# Altium PCB PCB2.PcbDoc
Units mil, origin at the board's own origin, x right, y up, seen from the top; angles counter-clockwise.
Board outline 2520 x 1820 mil, 2 copper layers (Top Layer, Bottom Layer); 51 components, 35 nets, 196 pads, 76 vias.
Unrouted connection lines stored in the file: 1.
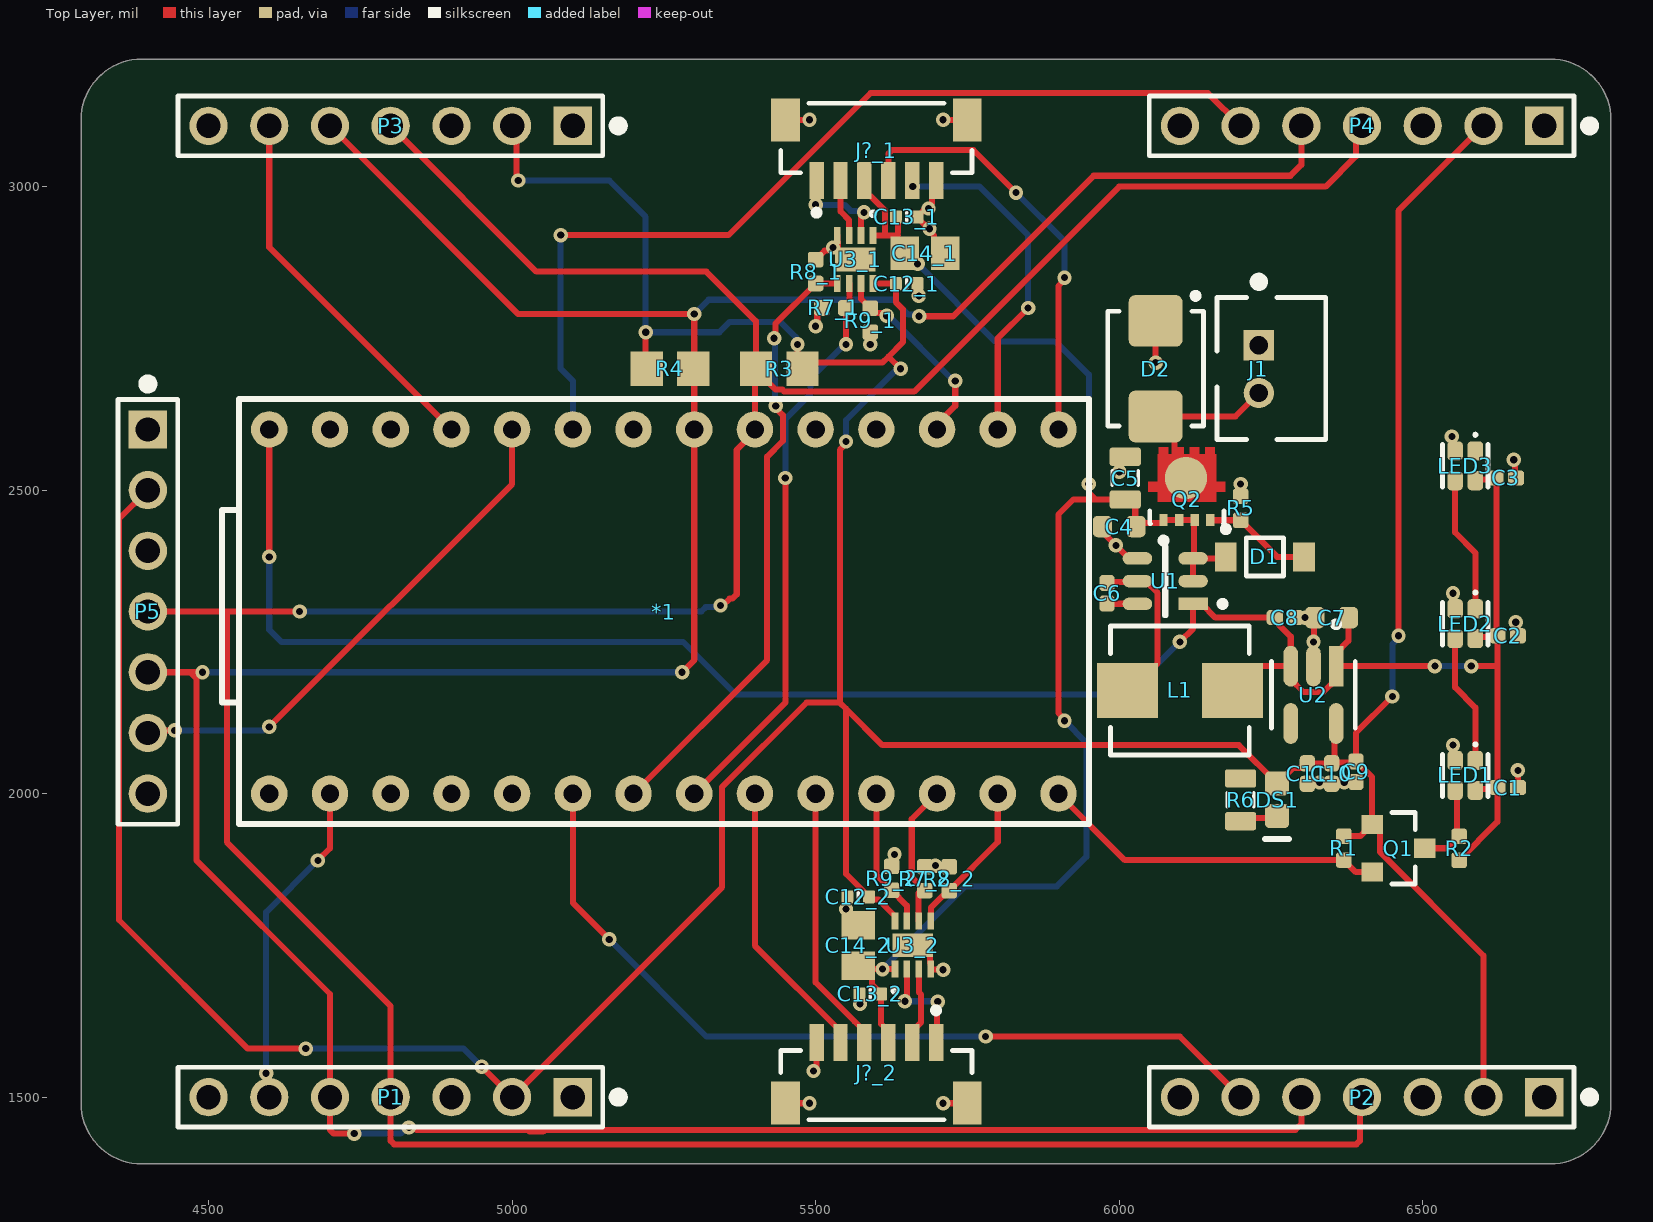
[diagram p0: Top Layer view]
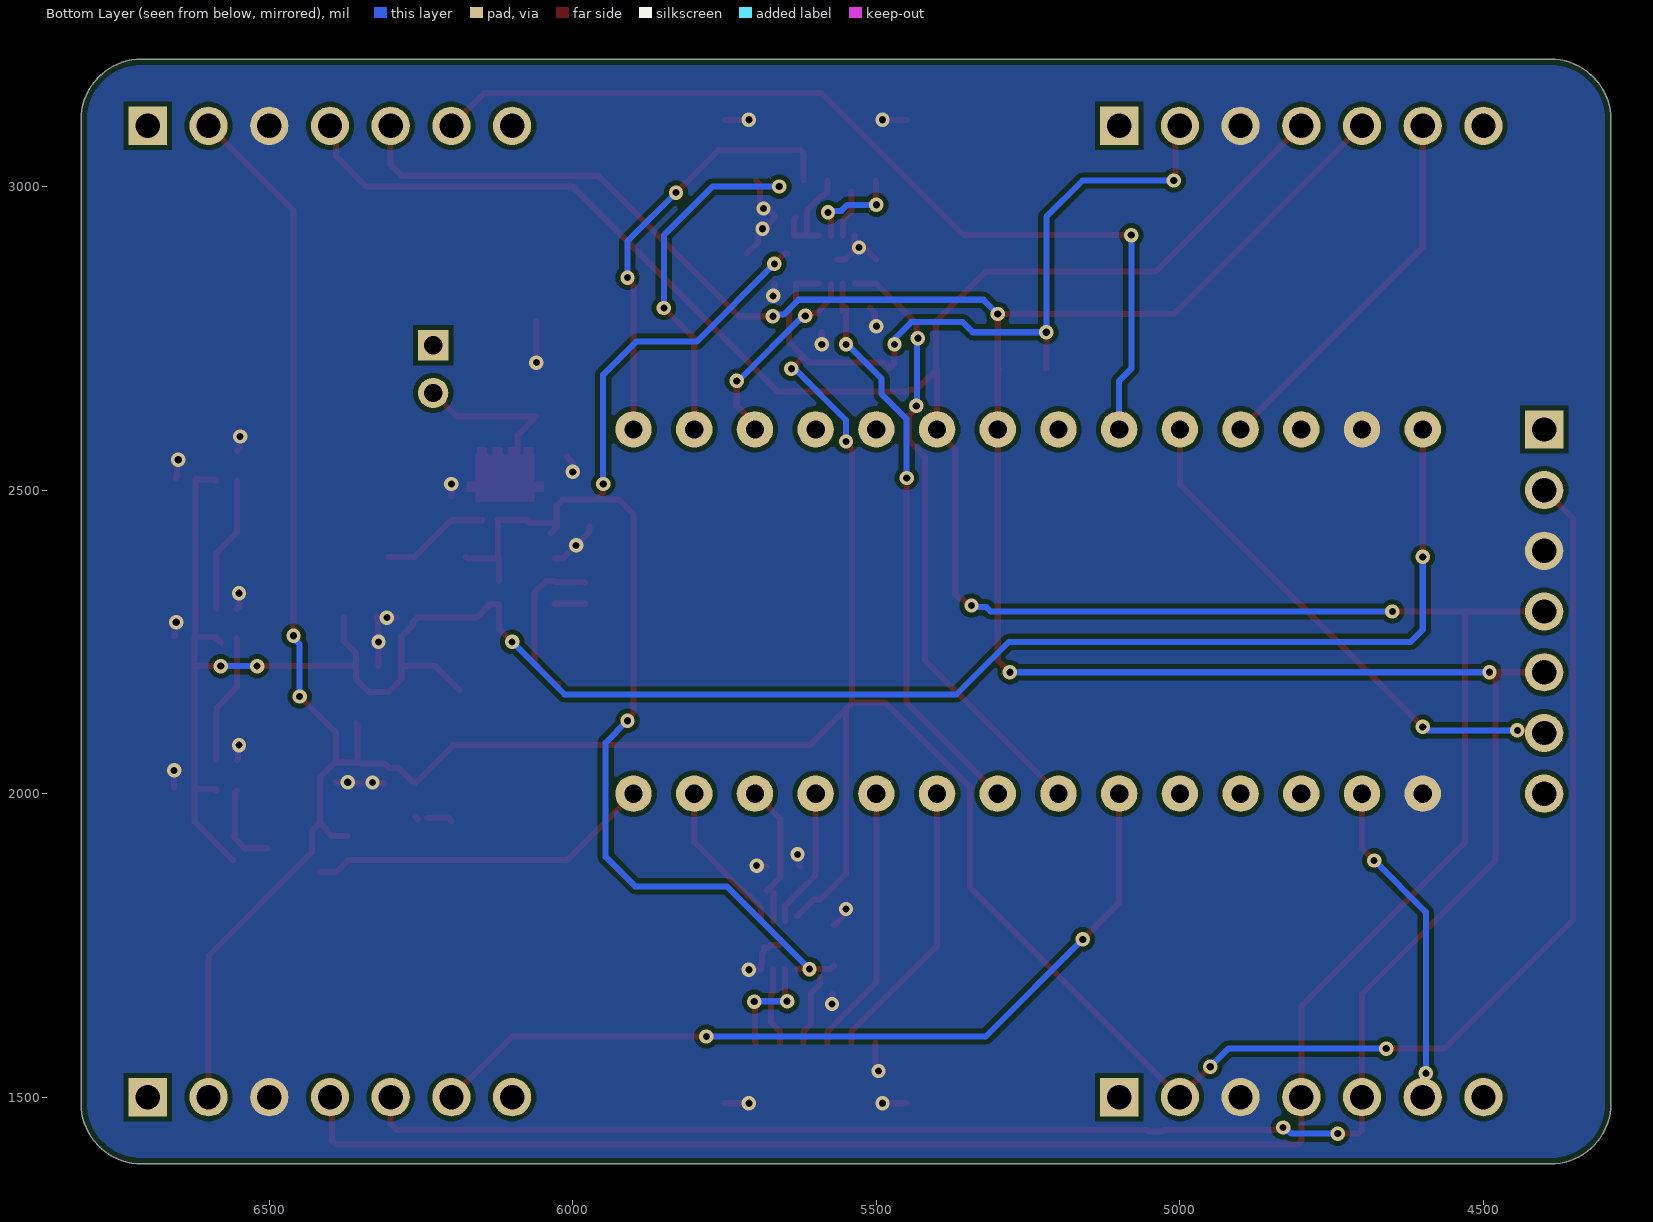
[diagram p1: Bottom Layer view, seen from below]
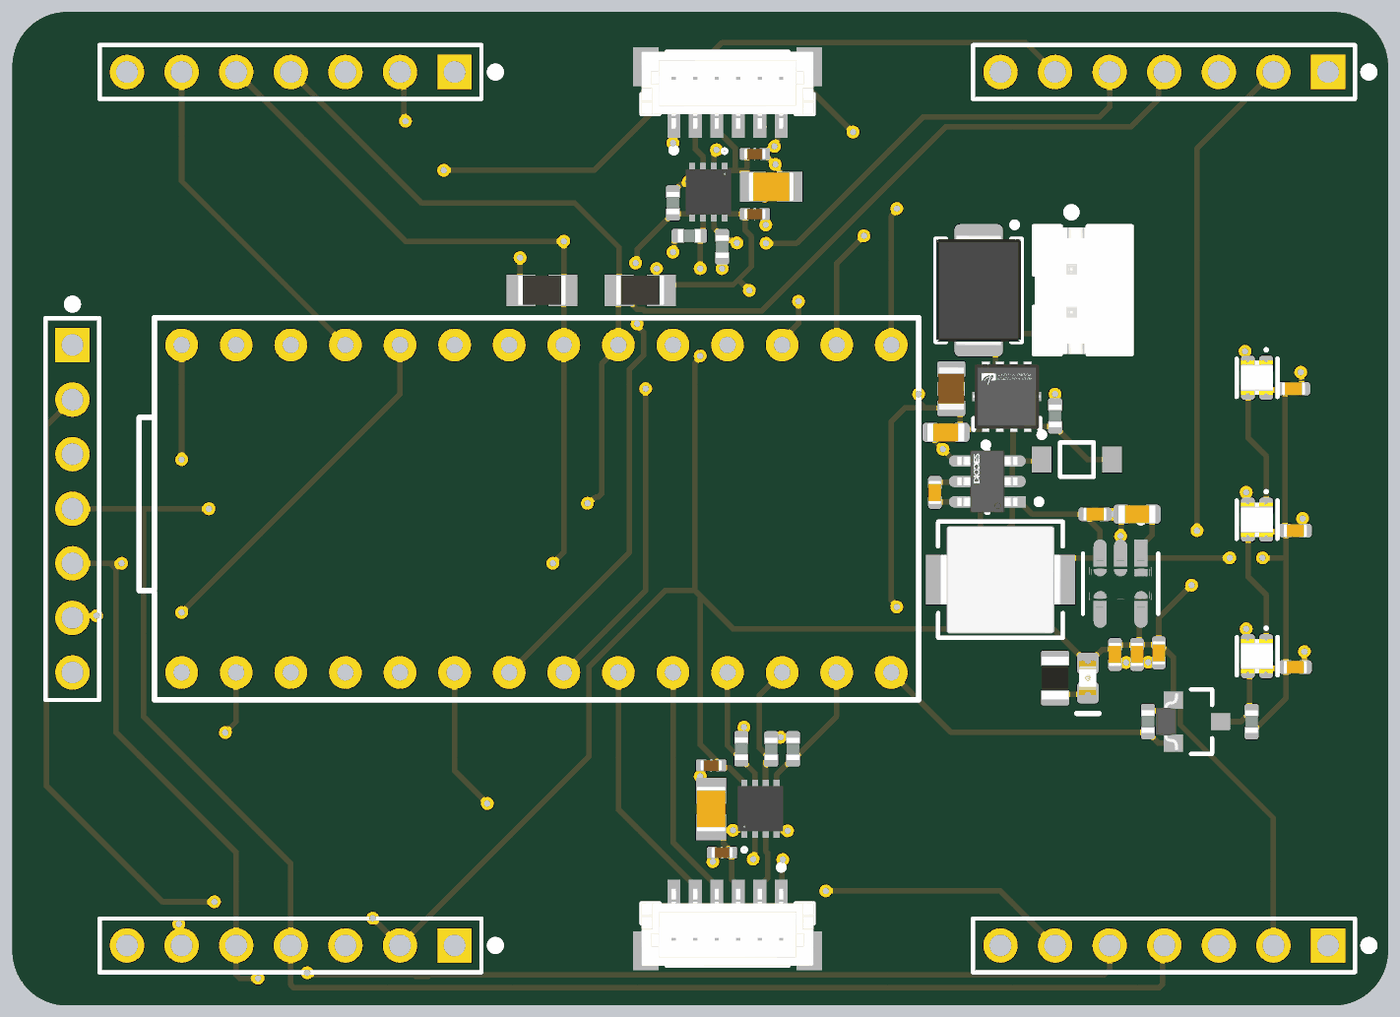
[diagram p2: 3D render of the assembled board from above, using the file's embedded part models]

## Layer stack, top to bottom
Top Solder: solder mask 0.4, Solder Resist, Dk 3.5
Top Layer: signal copper 1.4
Dielectric 1: dielectric 12.6, FR-4, Dk 4.8
Bottom Layer: signal copper 1.4
Bottom Solder: solder mask 0.4, Solder Resist, Dk 3.5

## Board outline
4290,1490 4290,3110 cw(c4390,3110) 4390,3210 6710,3210 cw(c6710,3110) 6810,3110 6810,1490 cw(c6710,1490) 6710,1390 4390,1390 cw(c4390,1490)

## Design rules (kind name [scope] priority, off if disabled: settings)
BoardOutlineClearance [All] p1: gap=10 ignorepadtopadclearanceinfootprint=FALSE except(0: Arc-SplitContinuation Track-SplitContinuation SMDPad-SplitContinuation THPad-SplitContinuation Via-SplitContinuation Fill-SplitContinuation Poly-SplitContinuation Region-SplitContinuation Text-SplitContinuation)
Clearance [All] p1: gap=7.87 ignorepadtopadclearanceinfootprint=TRUE except(3.94: Arc-SMDPad Track-SMDPad; 5.91: Arc-Text Track-Text SMDPad-SMDPad SMDPad-Text THPad-Text Via-Text Fill-Text Poly-Text Region-Text; 9.84: Arc-Via Track-Via; 10: SMDPad-THPad SMDPad-Via THPad-THPad THPad-Via Via-Via Text-Text; 11.02: Arc-THPad Track-THPad)
DiffPairsRouting [All] p1: maxlimit=7.87 minlimit=7.87 mostfreqgap=7.87 toplayer_minwidth=15 toplayer_maxwidth=21.19 toplayer_prefwidth=21.19 bottomlayer_minwidth=15 bottomlayer_maxwidth=21.19 bottomlayer_prefwidth=21.19 impedanceprofiledriven=TRUE impedanceprofileid={89AA14D4-A2A4-49F1-A537-A2CA9A9DB853} maxuncoupledlength=500
Height [All] p1: minheight=0 maxheight=99999 prefheight=500
HoleSize [All] p1: absolutevalues=TRUE maxlimit=196.85 minlimit=1 maxpercent=80.000 minpercent=20.000
MinimumSolderMaskSliver [All] p1: minsoldermaskwidth=3.94
PlaneConnect [All] p1: planeconnectstyle=Direct reliefexpansion=20 reliefentries=4 reliefconductorwidth=10 reliefairgap=10
PolygonConnect [All] p1: connectstyle=Direct reliefconductorwidth=10 reliefentries=4 polygonreliefangle="90 Angle" airgapwidth=10
RoutingVias [All] p1: holewidth=11.81 width=23.62 viastyle="Through Hole" minholewidth=11.81 minwidth=19.68 maxholewidth=11.81 maxwidth=31.5
SilkToSolderMaskClearance [IsPad] p1: minsilkscreentomaskgap=2.01 clearancetoexposedcopper=TRUE
SolderMaskExpansion [All] p1: expansion=1.5 istentingtop=FALSE
SupplyNets "Schematic Supply Nets_12" [InNet('P5V0')] p1: voltage=0.000
SupplyNets "Schematic Supply Nets_11" [InNet('VINUP')] p2: voltage=0.000
SupplyNets "Schematic Supply Nets_1" [InNet('VIN')] p3: voltage=0.000
SupplyNets "Schematic Supply Nets_6" [InNet('GND')] p4: voltage=0.000
SupplyNets "Schematic Supply Nets_2" [InNet('P3V3')] p5: voltage=0.000
UnRoutedNet [All] p1: checkbadconnections=TRUE
Width [All] p1: maxlimit=590.55 minlimit=6.3 preferedwidth=10 minimp=50.000000 maximp=50.000000 favimp=50.000000
23 further rules are at their usual default settings.

## Classes and differential pairs
channel class MotorControl: U_MotorControl1 U_MotorControl2
component class U_Power: C4 C5 C6 C7 C8 C9 C10 C11 D1 D2 DS1 J1 L1 Q2 R5 R6 U1 U2
component class U_MotorControl2: C12_2 C13_2 C14_2 J?_2 R7_2 R8_2 R9_2 U3_2
component class U_MotorControl1: C12_1 C13_1 C14_1 J?_1 R7_1 R8_1 R9_1 U3_1
component class U_Microcontroller: *1
component class U_GPIO: C1 C2 C3 LED1 LED2 LED3 P1 P2 P3 P4 P5 Q1 R1 R2 R3 R4

## Components (designator, comment, footprint, x,y, rotation, side; value= is the part's Value field where it differs from the comment)
*1 "TEENSY40" TEENSY40-Footprint-1 4550,1950 r0 top
C1 "100n 16V X7R 0402" C0402 6640,2010 r0 top value=100nF
C2 "100n 16V X7R 0402" C0402 6640,2260 r0 top value=100nF
C3 "100n 16V X7R 0402" C0402 6636.93,2520 r0 top value=100nF
C4 "10uF 35V 0603" C0603 6000,2440 r180 top value=10u
C5 "Capacitor 47µF +/-40% 6.3V 0805" CAPC0805(2012)145_L 6010,2520 r90 top value=47µF
C6 "100n 16V X7R 0402" C0402 5980,2330 r270 top value=100nF
C7 "22uF 10V 0603 X5R" C0603 6350,2290 r180 top value=22uF
C8 "1uF 16V X5R 0402" C0402 6273.07,2290 r0 top value=1u
C9 "1uF 16V X5R 0402" C0402 6390,2036.14 r270 top value=1u
C10 "1uF 16V X5R 0402" C0402 6350,2033.07 r270 top value=1u
C11 "1uF 16V X5R 0402" C0402 6310,2033.07 r270 top value=1u
C12_1 "Capacitor 100nF +/-20% 25V 0402" CAPC0402(1005)60_L 5650,2840 r180 top value=100nF (schematic designator C12)
C12_2 "Capacitor 100nF +/-20% 25V 0402" CAPC0402(1005)60_L 5570,1830 r0 top value=100nF (schematic designator C12)
C13_1 "Capacitor 100nF +/-20% 25V 0402" CAPC0402(1005)60_L 5650,2950 r180 top value=100nF (schematic designator C13)
C13_2 "Capacitor 100nF +/-20% 25V 0402" CAPC0402(1005)60_L 5590,1670 r0 top value=100nF (schematic designator C13)
C14_1 "Capacitor 10 uF +/- 10% 16 V 0805" CAPC2013X135X45NL10T25 5680,2890 r180 top value=10µF (schematic designator C14)
C14_2 "Capacitor 10 uF +/- 10% 16 V 0805" CAPC2013X135X45NL10T25 5570,1750 r270 top value=10µF (schematic designator C14)
D1 "MMSZ10T1G" ONSC-SOD-123-2-425-04_V 6240,2390 r0 top
D2 "SMBJ17CA" DO214-AA 6060,2700 r270 top
DS1 "KT-0603W" LED0603 6260,1990 r270 top
J1 "CONN-00048" JST_PHR_2_0 6230,2738.74 r270 top
J?_1 "BM06B-SRSS-TBT(LF)(SN)" FP-BM06B-SRSS-TBT_LF_SN-MFG 5600,3080 r0 top (schematic designator J?)
J?_2 "BM06B-SRSS-TBT(LF)(SN)" FP-BM06B-SRSS-TBT_LF_SN-MFG 5600,1520 r180 top (schematic designator J?)
L1 "4.7uH 4.5A FXL0530-4R7-M" INDP5452X30N 6100,2170 r0 top value=4u7
LED1 "XL-1615RGBC-WS2812B" XL-1615RGBC-WS2812B-Footprint-1 6570,2030 r270 top
LED2 "XL-1615RGBC-WS2812B" XL-1615RGBC-WS2812B-Footprint-1 6570,2280 r270 top
LED3 "XL-1615RGBC-WS2812B" XL-1615RGBC-WS2812B-Footprint-1 6570,2540 r270 top
P1 "CONN-00105" HDDR_7x1_0 4800,1500 r180 top
P2 "CONN-00105" HDDR_7x1_0 6400,1500 r180 top
P3 "CONN-00105" HDDR_7x1_0 4800,3100 r180 top
P4 "CONN-00105" HDDR_7x1_0 6400,3100 r180 top
P5 "CONN-00105" HDDR_7x1_0 4400,2300 r270 top
Q1 "2N7002H6327XTSA2" FP-PG-SOT23-3-MFG 6460,1910 r0 top
Q2 "AONR21321" FP-DFN3x3A_8L_EP1_P-MFG 6111.48,2505.53 r0 top
R1 "1k 1% 0402" R0402 6370,1910.32 r270 top value=1k
R2 "1k 1% 0402" R0402 6560,1910 r90 top value=1k
R3 "Resistor 4k7 +/-1% 0805 125 mW" RESC2013X70X40ML20T20 5440,2700 r0 top value=4.7k
R4 "Resistor 4k7 +/-1% 0805 125 mW" RESC2013X70X40ML20T20 5260,2700 r180 top value=4.7k
R5 "10k 1% 0402" R0402 6200,2470 r270 top value=10k
R6 "Resistor 1K +/-5% 0805 125 mW" RESC0805(2012)_L 6200,1990 r90 top value=1k
R7_1 "10k 1% 0402" R0402 5530,2800 r0 top value=10k (schematic designator R7)
R7_2 "10k 1% 0402" R0402 5680,1860 r270 top value=10k (schematic designator R7)
R8_1 "10k 1% 0402" R0402 5500,2860 r270 top value=10k (schematic designator R8)
R8_2 "10k 1% 0402" R0402 5720,1860 r270 top value=10k (schematic designator R8)
R9_1 "10k 1% 0402" R0402 5590,2780 r90 top value=10k (schematic designator R9)
R9_2 "10k 1% 0402" R0402 5625.16,1860.5 r270 top value=10k (schematic designator R9)
U1 "AP63205WU-7" FP-TSOT26-IPC_B 6075.89,2350 r180 top
U2 "AP2112K-3.3TRG1" FP-SOT25-IPC_A 6320,2162.73 r270 top
U3_1 "DRV8212PDSGR" WSON8_DSG_TEX 5565,2880 r270 top (schematic designator U3)
U3_2 "DRV8212PDSGR" WSON8_DSG_TEX 5660.16,1750.5 r90 top (schematic designator U3)

## Footprints (in the part's own frame and the unit in brackets; to place one, negate y for a bottom-side part, rotate by r counter-clockwise, add the part's x,y. Pads: shape width x height; smd on the part's side, far side on the other; paste and mask are expansions set on the pad)
C0402 [mm] "Chip Capacitor, 2-Leads, Body 1.00x0.50mm, IPC Medium Density"
  rrect50% 0.68x0.64 smd: 1(-0.43,0) 2(0.43,0)
  body extent -0.55,-0.3 0.55,0.3, height 0.6
C0603 [mm] "Chip Capacitor, 2-Leads, Body 1.60x0.75mm, IPC Medium Density"
  rrect50% 0.8x0.9 smd: 1(-0.7,0) 2(0.7,0)
  body extent -0.87,-0.43 0.87,0.43, height 0.8
CAPC0402(1005)60_L [mm] "Chip Capacitor, Body 1.0x0.5mm, Height 0.6mm, IPC High Density"
  rrect25% 0.5x0.55 smd: 1(-0.45,0) 2(0.45,0)
  silkscreen extent 0,-0.2 0,0.2, body extent -0.5,-0.25 0.5,0.25, height 0.6
CAPC0805(2012)145_L [mm] "Chip Capacitor, Body 2.0x1.2mm, Height 1.45mm, IPC High Density"
  rrect25% 0.76x1.3 smd: 1(-0.9,0) 2(0.89,0)
  silkscreen extent -0.3,-0.55 0.3,0.55, body extent -1,-0.6 1,0.6, height 1.45
CAPC2013X135X45NL10T25 [mm] "Chip Capacitor, 2-Leads, Body 2.10x1.35mm, IPC Medium Density"
  rect 1.2x1.4 smd: 1(-0.85,0) 2(0.85,0)
  body extent -1.05,-0.67 1.05,0.67, height 1.35
DO214-AA [mm] "DO214-AA Diode Package"
  rrect25% 2.16x2.25 smd: 1(-2,0) 2(2,0)
  silkscreen extent -3.17,-2 2.4,2, body extent -2.6,-1.97 2.6,1.97, height 2.61
FP-BM06B-SRSS-TBT_LF_SN-MFG [mm]
  rect 0.6x1.55 smd paste+0 mask+0: 1(-2.5,-1.775) 2(-1.5,-1.775) 3(-0.5,-1.775) 4(0.5,-1.775) 5(1.5,-1.775) 6(2.5,-1.775)
  rect 1.2x1.8 smd paste+0 mask+0: 7(-3.8,0.75) 8(3.8,0.75)
  silkscreen extent -4,-3.25 4,1.45, body extent -4.5,-2.65 4.5,1.75, height 0.25
FP-DFN3x3A_8L_EP1_P-MFG [mm]
  rect 0.35x0.5 smd paste+0 mask+0: 1(-0.975,-1.4) 2(-0.325,-1.4) 3(0.325,-1.4) 4(0.975,-1.4)
  round 1.769 smd paste+0 mask+0: 5-6-7-8(-0.038,0.367)
  Top Layer region: -1.225,-0.63 -1.225,-0.215 -1.605,-0.215 -1.605,0.215 -1.225,0.215 -1.225,1.35 -1.175,1.35 -1.175,1.65 -0.775,1.65 -0.775,1.35 -0.525,1.35 -0.525,1.65 -0.125,1.65 -0.125,1.35 0.125,1.35 0.125,1.65 0.525,1.65 0.525,1.35 0.775,1.35 0.775,1.65 1.175,1.65 1.175,1.35 1.225,1.35 1.225,0.215 1.605,0.215 1.605,-0.215 1.225,-0.215 1.225,-0.63
  silkscreen extent -1.55,-2.37 1.55,-1.01, body extent -1.71,-1.75 1.71,1.75, height 0.25
FP-PG-SOT23-3-MFG [mm]
  rect 0.9x0.8 smd paste+0 mask+0: 1(-1.1,1) 2(-1.1,-1) 3(1.1,0)
  silkscreen extent -0.28,-1.5 0.7,1.5, body extent -1.65,-1.6 1.65,1.6, height 0.25
FP-SOT25-IPC_A [mm]
  rect 1.707x0.616 smd paste+0 mask+0: 1(-1.201,0.95)
  rrect100% 1.707x0.616 smd paste+0 mask+0: 2(-1.201,0) 3(-1.201,-0.95) 4(1.201,-0.95) 5(1.201,0.95)
  silkscreen extent -3.08,-1.75 1.4,1.75, body extent -2.55,-2 2.55,2, height 0.25
FP-TSOT26-IPC_B [mm]
  rect 1.24x0.526 smd paste+0 mask+0: 1(-1.165,0.95)
  rrect100% 1.24x0.526 smd paste+0 mask+0: 2(-1.165,0) 3(-1.165,-0.95) 4(1.166,-0.95) 5(1.166,0) 6(1.166,0.95)
  silkscreen extent -2.53,-1.45 0.05,1.45, body extent -2.04,-1.7 2.04,1.7, height 0.25
HDDR_7x1_0 [mm]
  rect 1.6x1.6 hole 1.016: 1(-7.62,0)
  round 1.6 hole 1.016: 2(-5.08,0) 3(-2.54,0) 4(0,0) 5(2.54,0) 6(5.08,0) 7(7.62,0)
  silkscreen extent -9.72,-1.25 8.9,1.25, body extent -8.89,-1.27 8.89,1.27, height 8.54
INDP5452X30N [mm] "Precision Wire Wound Inductor, 2-Leads, Body 5.40x5.20mm, IPC Medium Density"
  rect 2.55x2.3 smd: 1(-2.2,0) 2(2.2,0)
  silkscreen extent -2.9,-2.7 2.9,2.7, body extent -2.8,-2.5 2.8,2.5, height 3
JST_PHR_2_0 [mil]
  rect 50x50 hole 30: 1(0,0)
  round 50 hole 30: 2(78.74,0)
  silkscreen extent -112,-69 156,110, body extent -77,-69 156,110, height 236
LED0603 [mm] "0603 LED"
  rrect35% 1x1 smd: 1(0.685,0) 2(-0.685,0)
  silkscreen extent 1.65,-0.51 1.65,0.51, body extent -0.8,-0.4 0.8,0.4, height 0.55
ONSC-SOD-123-2-425-04_V [mm] "SOD, 2-Leads, Body 2.69x1.6mm"
  rect 0.91x1.22 smd: 1(-1.635,0) 2(1.635,0)
  silkscreen extent -1.76,-0.8 0.78,1.28, body extent -1.35,-0.8 1.35,0.8, height 1.35
R0402 [mm] "R0402"
  rrect35% 0.65x0.65 smd: 1(-0.5,0) 2(0.5,0)
  body extent -0.53,-0.29 0.53,0.29, height 0.38
RESC0805(2012)_L [mm] "Chip Resistor, Body 2.0x1.3mm, IPC High Density"
  rrect25% 0.76x1.3 smd: 1(-0.9,0) 2(0.89,0)
  silkscreen extent -0.3,-0.55 0.3,0.55, body extent -1,-0.62 1,0.63, height 0.6
RESC2013X70X40ML20T20 [mm] "Chip Resistor, 2-Leads, Body 2.2x1.35mm, IPC Low Density"
  rect 1.35x1.45 smd: 1(-0.975,0) 2(0.975,0)
  body extent -1.1,-0.67 1.1,0.67, height 0.7
TEENSY40-Footprint-1 [mil]
  round 60 hole 30: 0(150,50) 1(250,50) 2(350,50) 3(450,50) 3V3(250,650) 4(550,50) 5(650,50) 6(750,50) 7(850,50) 8(950,50) 9(1050,50) 10(1150,50) 11(1250,50) 12(1350,50) 13(1350,650) 14(1250,650) 15(1150,650) 16(1050,650) 17(950,650) 18(850,650) 19(750,650) 20(650,650) 21(550,650) 22(450,650) 23(350,650) GND1(50,50) GND2(150,650) Vin(50,650)
  silkscreen extent -28,0 1400,700
WSON8_DSG_TEX [mil]
  rect 28x11 smd paste+0 mask+0: 1(-39.5,29.53) 2(-39.5,9.84) 3(-39.5,-9.84) 4(-39.5,-29.53) 5(39.5,-29.53) 6(39.5,-9.84) 7(39.5,9.84) 8(39.5,29.53)
  rect 39x67 smd paste+0 mask+0: 9(0,0)
  silkscreen extent -79,26 -71,34, body extent -41,-41 41,41, height 32
XL-1615RGBC-WS2812B-Footprint-1 [mm]
  rrect50% 0.8x0.65 smd mask+0.05: 1(-0.625,0.425) 2(0.625,0.425) 3(-0.625,-0.425) 4(0.625,-0.425)
  silkscreen extent -1.36,-0.95 0.89,0.95, body extent -0.8,-0.75 0.8,0.75, height 0.7

## Part data
*1: library part CMP-020-00024-3, "PJRC Teensy 4.0 USB Development Board"
C1 C2 C3 C6: library part CMP-001-00088-6, "100nF 16V X7R ±10% 0402 Multilayer Ceramic Capacitors MLCC - SMD/SMT ROHS", Dielectric=X7R, LCSC Part #=C1525, Package=0402, Voltage=16V
C4: library part CMP-001-00102-3, "35V 10uF X5R ±20% 0603 Multilayer Ceramic Capacitors MLCC - SMD/SMT ROHS", Dielectric=X5R, LCSC Part #=C194427, Package=0603, Voltage=35V
C5: library part CMP-001-00082-3, "Chip Capacitor, 47µF +/-40%, 6.3V, 0805, Thickness 1.45 mm", Case/Package=0805, Max Operating Temperature=85°C, Min Operating Temperature=-55°C, Tolerance=10%, Voltage Rating=6.3V, Mounting Technology=SMT, Pins=2
C7: library part CMP-001-00110-2, "10V 22uF X5R ±20% 0603 Multilayer Ceramic Capacitors MLCC - SMD/SMT ROHS", Dielectric=X5R, LCSC Part #=C86295, Package=0603, Voltage=10V
C8 C9 C10 C11: library part CMP-001-00098-3, "16V 1uF X5R ±10% 0402 Multilayer Ceramic Capacitors MLCC - SMD/SMT ROHS", Dielectric=X5R, LCSC Part #=C29266, Package=0402, Voltage=16V
C12_1 C12_2 C13_1 C13_2: library part CMP-001-00065-3, "Chip Capacitor, 100nF +/-20%, 25V, 0402, Thickness 0.6 mm", Case/Package=0402, Max Operating Temperature=85°C, Min Operating Temperature=-55°C, Tolerance=10%, Voltage Rating=25V, Mounting Technology=SMT, Pins=2
C14_1 C14_2: library part CMP-001-00015-7, "Chip Capacitor, 10 uF, +/- 10%, 16 V, 0805 (2012 Metric)", Capacitor Type=Ceramic, Case/Package=0805, Max Operating Temperature=85°C, Min Operating Temperature=-55°C, Tolerance=10%, Voltage Rating=16V, Mounting Technology=SM, Pins=2, RoHS Compliant=True
D1: library part CMP-1060-00410-1, "Zener Voltage Regulator, 500 mW, 2-Pin SOD-123, Pb-Free, Tape and Reel", Manufacturer="On Semiconductor", ComponentLink1Description="Manufacturer URL", ComponentLink1URL=http://www.onsemi.com/, ComponentLink2Description=Datasheet, ComponentLink2URL=http://www.onsemi.com/pub_link/Collateral/MMSZ2V4T1-D.PDF, ComponentLink3Description="Package Specification", ComponentLink3URL=http://www.onsemi.com/pub_link/Collateral/425-04.PDF, DatasheetVersion="Rev. 11", Mounting Technology="Surface Mount", P Max (W)=0.5, PackageDescription="2-Pin SOD, Body 1.6 x 2.69 mm", PackageReference=SOD-123-2-425-04, PackageVersion="Rev. G, 10/2009", Packing="Tape and Reel", PartNumber=MMSZ10T1G, RoHS=Pb-Free
D2: library part CMP-004-00048-1, "Trans Voltage Suppressor Diode, 600W, 17V V(RWM), Bidirectional, 1 Element, Silicon", Max Operating Temperature=170°C, Min Operating Temperature=-55°C
DS1: library part CMP-00026-00001-1, Case/Package=0603, Forward Voltage Max=3.1, Forward Voltage Min=2.6, Pins=2
J1: library part CMP-019-000047-1, "JST PH 2x1, THT, 2.00mm Pitch", Manufacturer=JST, Manufacturer PN=B2B-PH-K, Component Type=Standard, Cost=0.19, Design Item ID=CONN-00048, Levels=1, Part Number=CONN-00048, Pin Count=2, Positions per level=2, Source=Connectors$.SchLib, Type=Header
J?_1 J?_2: library part CMP-17439-000255-1, "CONN HEADER SMD 6POS 1MM", Color=Natural, Contact Resistance=20mR, Current Rating=1A, Flammability Rating="UL94 V-0", Insulation Resistance=100MR, Max Operating Temperature=85°C, Max Voltage Rating (AC)=50V, Min Operating Temperature=-25°C, Package Quantity=1, Connector Type=Header, Contact Finish - Mating=TIN, Contact Material="Copper Alloy", Contact Plating=Tin, Contact Shape=Square, Contact Type="Male Pin", Depth=3.6mm, Fastening Type=Pull, Gender=Male, Housing Color=Natural, Housing Material=Polyamide, Insulation Color=Natural, Insulation Material=Nylon, Lead Free="Lead Free", Length=8mm, Mated Stacking Heights=4.9mm, Material=Polyamide, Max Current Rating=1A, Max Voltage Rating (DC)=50V, Mount="Surface Mount", Number of Positions=6, Number of Rows=1, Orientation=Straight, Packaging="Tape and Reel", Pitch=1mm, Series=SR, Termination=Solder, Voltage Rating=50V
L1: library part CMP-006-00030-1, "4.5A 4.7uH Integrated molded inductor ±20% 5A SMD,5.2x5.4mm Power Inductors ROHS", LCSC Part #=C177246, Saturation Current=5A
LED1 LED2 LED3: library part CMP-007-00038-3, "1615  RGB LEDs(Built-in IC) ROHS", LCSC Part #=C5349954, Package=SMD-4P,1.6x1.5mm, LED Type=Addressable
P1 P2 P3 P4 P5: library part CMP-019-000100-1, "Header, 7x1, 0.1\"", Manufacturer=Samtec, Manufacturer PN=TSW-107-07-F-S, Component Type=Standard, Cost=0.61, Design Item ID=CONN-00105, Levels=1, Part Number=CONN-00105, Pin Count=7, Positions per level=7, Source=Connectors$.SchLib, Type=Header
Q1: library part CMP-32901-000180-1, "MOSFET N-CH 60V 0.3A SOT23", Case/Package=SOT-23, Continuous Drain Current (ID)=300mA, Drain to Source Voltage (Vdss)=60V, Gate to Source Voltage (Vgs)=20V, Input Capacitance=20pF, Max Operating Temperature=150°C, Max Power Dissipation=500mW, Min Operating Temperature=-55°C, Halogen Free="Halogen Free", Lead Free="Lead Free", Max Dual Supply Voltage=60V, Mount="Surface Mount", Number of Pins=3, Packaging="Tape and Reel", Rds On Max=3R, Rise Time=3.3ns
Q2: library part CMP-83955-000004-1, "MOSFET P-CH 30V 3X3 DFN EP", Continuous Drain Current=-24A, Drain To Source Breakdown Voltage=-30V, Drain To Source Resistance=13.5mΩ, Gate To Source Voltage=25V, Input Capacitace At Vds="1180pF @ -15V", Manufacturer="Alpha & Omega Semiconductor", Max Forward Diode Voltage=-1V, Max Junction Temp=+150°C, Package=DFN3x3A_8L_EP1_P, Power Dissipation=4.1W, Pulse Drain Current=-66A, Temperature="-55°C to +150°C", Temperature Range Low=-55°C, Typ Forward Diode Voltage=-0.72V, Automotive=No, Category=Trans, ComponentLink2Description=Datasheet, ComponentLink2URL=http://www.aosmd.com/pdfs/datasheet/AONR21321.pdf, Depletion Mode=False, Device Class L1="Discrete Semiconductors", Device Class L2=Transistors, Device Class L3=MOSFETs, Digikey Description="MOSFET P-CH 30V 3X3 DFN EP", Drain To Source Voltage=-30V, Footprint Url=http://www.aosmd.com/res/packaging_information/DFN3x3-8L.pdf, Gate Charge At Vgs="21nC @ -10V", Height=0.9mm, Lead Free=Yes, Manufacturer Part Number=AONR21321, Number Of Channels=1, Number Of P Channels=1, Octopart=https://octopart.com/aonr21321-alpha+%26+omega+semiconductor-96014005, Reverse Recovery Charge=15nC, Reverse Recovery Time=10ns, RoHS=TRUE, Rthja Max=60°C/W, Standoff Height=0mm, Temperature Range High=+150°C, Threshold Vgs Max=-2.3V, Threshold Vgs Min=-1.3V, Transconductance=25S, Turn Off Delay Time=30ns, Turn On Delay Time=10.5ns
R1 R2: library part CMP-009-00189-3, "62.5mW Thick Film Resistors 50V ±100ppm/℃ ±1% 1kΩ 0402 Chip Resistor - Surface Mount ROHS", LCSC Part #=C106235, Package=0402, Tolerance=1%
R3 R4: library part CMP-009-00032-4, "Chip Resistor, 4.7 KOhm, +/- 1%, 0.125 W, -55 to 155 degC, 0805 (2012 Metric)", Case/Package=0805, Max Operating Temperature=155°C, Min Operating Temperature=-55°C, Power=125mW, Tolerance=1%, Voltage Rating=150V, Mounting Technology=SM, Pins=2, RoHS Compliant=True
R5 R7_1 R7_2 R8_1 R8_2 R9_1 R9_2: library part CMP-009-00187-3, "62.5mW Thick Film Resistors 50V ±100ppm/℃ ±1% 10kΩ 0402 Chip Resistor - Surface Mount ROHS", LCSC Part #=C60490, Package=0402, Tolerance=1%
R6: library part CMP-009-00118-2, "Chip Resistor, 1 kOhms, +/-5%, 125 mW, -55 to 155 degC, 0805", Case/Package=0805, Max Operating Temperature=155°C, Min Operating Temperature=-55°C, Power=125mW, Tolerance=5%, Pins=2
U1: library part CMP-019-00066-4, "Switching Regulator"
U2: library part CMP-12756-000035-1, "IC REG LINEAR 3.3V 600MA SOT25", Case/Package=SOT-23-5, Dropout Voltage=250mV, Max Input Voltage=6V, Max Operating Temperature=85°C, Max Output Current=600mA, Min Input Voltage=2.5V, Min Operating Temperature=-40°C, Output Voltage=3.3V, Package Quantity=1, Quiescent Current=55uA, Accuracy=1.5%, Height=1.3mm, Lead Free="Lead Free", Length=3.1mm, Mount="Surface Mount", Number of Outputs=1, Number of Pins=5, Number of Regulators=1, Output Current=600mA, Output Type=Fixed, Packaging="Tape and Reel", Polarity=Positive, Width=1.7mm
U3_1 U3_2: library part CMP-152-000000-2, "12-V, 3-A H-bridge motor driver, PWM control&nbsp;with low power sleep mode 8-WSON -40 to 125", Manufacturer_Name="Texas Instruments", Copyright="Copyright (C) 2026 Ultra Librarian. All rights reserved.", Design Item ID=DRV8212PDSGR, Manufacturer_Part_Number=DRV8212PDSGR, RefDes=RefDes, Source=DRV8212PDSGR.SchLib, Type=Type

## Via types
v1: diameter 23.62, hole 11.81, Top Layer to Bottom Layer, 76 vias

## Nets (pads, with @x,y where several pads share a name; then routed paths per layer and width w, separated by ;. In a path a pad name is that pad's centre, name@x,y a point inside that pad or via, vN(x,y) a via of type N, cw(c..) or ccw(c..) an arc to the next point about the centre after c; other vN are vias at no path point)
GND: *1.GND1 *1.GND2 C1.2 C2.2 C3.2 C4.2 C5.2 C7.2 C8.2 C9.2 C10.2 C11.2 C12_1.1 C12_2.1 C13_1.1 C13_2.1 C14_1.1 C14_2.1 D2.1 J?_1.6 J?_1.7 J?_1.8 J?_2.6 J?_2.7 J?_2.8 LED1.3 LED2.3 LED3.3 P1.3 P2.3 P3.3 P4.3 P5.3 R5.1 R6.2 R7_1.1 R7_2.1 R8_1.1 R8_2.1 R9_1.1 R9_2.1 U1.4 U2.2 U3_1.4 U3_1.9 U3_2.4 U3_2.9 | length 1265.5
  Top Layer w10: J?_2.8 5450.87,1490 v1(5490,1490) ; J?_1.7 5450.87,3110 v1(5490,3110) ; v1(5496.47,1543.18) 5501.57,1548.29 J?_2.6 ; v1(5500,2770) 5502.61,2772.61 5502.61,2792.29 R7_1.1 ; R8_1.1 5514.77,2894.46 5519.8,2894.46 5524.97,2899.62 v1(5528.65,2899.62) v1@5536.5,2899.62 ; U3_1.9@5533.44,2896.56 5534.44,2896.56 U3_1.9@5536.5,2894.5 ; U3_1.4 5535.97,2919 5535.97,2909.03 5536.5,2908.5 v1@5536.5,2899.62 ; v1(5550,1810) 5550,1802.09 5568.62,1783.46 C14_2.1 ; U3_1.9 5551,2880 U3_1.9@5536.5,2894.5 ; C13_2.1 5572.68,1669.6 5572.68,1653.91 v1(5573.08,1653.51) ; v1(5590,2740) R9_1.1 ; R9_2.1 5627.58,1882.61 5627.58,1897.58 v1(5630,1900) ; U3_2.9 5674.16,1750.5 5677.78,1746.88 5685.03,1746.88 5685.03,1739.62 5688.66,1736 5688.66,1720.53 5689.69,1719.5 U3_2.4 5690.19,1710.5 5709.5,1710.5 v1(5710,1710) ; C12_1.1 5667.72,2822.28 v1(5670,2820) ; C13_1.1 5667.72,2949.02 5686.08,2930.65 v1(5687.6,2930.65) ; C13_1.1@5667.72,2950.98 5677.93,2961.19 5683.29,2961.19 v1(5685.9,2963.8) 5685.9,2967.49 5691.61,2973.2 5691.61,3003.31 J?_1.6 ; R7_2.1 5695.48,1879.68 v1(5697.23,1881.44) ; v1@5686.73,2930 5686.73,2927.84 5694.84,2919.73 5694.84,2908.62 C14_1.1 ; v1(5710,1490) 5749.13,1490 J?_2.7 ; v1(5710,3110) 5749.13,3110 J?_1.8 ; C4.2 5972.44,2431.13 v1(5994.56,2409.01) 5994.56,2408.9 6016.06,2387.4 U1.4 ; v1(6000,2530) 6000,2545.08 C5.2 ; v1(6060,2710) D2.1 ; R5.1 v1(6200,2510) ; C8.2 v1(6306.22,2290) C7.2 6321.22,2288.78 6321.22,2251.22 v1(6320,2250) U2.2 ; C11.2 6311.11,2017.25 6328.89,2017.25 v1(6330,2018.37) ; C10.2 6351.32,2017.46 6369.4,2017.46 v1(6370.73,2018.79) ; v1@6370.79,2019.21 C9.2 ; v1(6548,2588.44) 6548,2569.87 LED3.3 ; v1(6550,2080) 6551.63,2078.37 6551.63,2056.24 LED1.3 ; v1(6550,2330) 6550,2307.87 LED2.3 ; v1(6650,2550) 6651.93,2548.07 6651.93,2521.93 C3.2 ; v1(6653.29,2282.27) 6655.11,2280.45 6655.11,2261.82 C2.2 ; v1(6656.68,2038.38) 6656.93,2038.13 C1.2 ; U3_1.9@5536.5,2894.5 v1@5536.5,2899.62
Net*1_0: *1.0 P1.6 | length 545.7
  Top Layer w10: v1(4594.82,1539.37) 4597.41,1536.78 4597.41,1502.59 P1.6 ; v1(4680,1890) 4700,1910 *1.0
  Bottom Layer w10: v1(4594.82,1539.37) 4594.82,1804.82 v1(4680,1890)
Net*1_4: *1.4 P2.6 | length 1412.5
  Top Layer w10: *1.4 5100,1820 v1(5160,1760) ; v1(5780,1600) 6100,1600 P2.6
  Bottom Layer w10: v1(5160,1760) 5320,1600 v1(5780,1600)
Net*1_5: *1.5 R8_1.2 U3_1.5 | length 1012.1
  Top Layer w10: *1.5 5420,2220 5420,2554.91 5446.02,2580.94 5446.02,2623.43 5434.34,2635.11 v1(5434.34,2638.79) ; v1(5431.59,2750.09) 5434.2,2752.69 5434.2,2774.52 R8_1.2 5500.09,2840.41 5535.38,2840.41 U3_1.5
  Bottom Layer w10: v1(5431.59,2750.09) 5432.97,2748.71 5432.97,2640.17 v1(5434.34,2638.79)
Net*1_6: *1.6 R7_1.2 U3_1.6 | length 951.7
  Top Layer w10: *1.6 5450,2150 v1(5450,2520) ; R7_1.2 5549.69,2740.31 v1(5550,2740) ; U3_1.6 5555.66,2840 R7_1.2@5555.66,2794.03
  Bottom Layer w10: v1(5450,2520) 5450,2616.76 5491.3,2658.06 5491.3,2683.61 5547.69,2740 v1(5550,2740)
Net*1_7: *1.7 J?_2.5 | length 468.5
  Top Layer w10: *1.7 5400,1749.53 5540.94,1608.58 J?_2.5
Net*1_8: *1.8 J?_2.4 | length 443.4
  Top Layer w10: *1.8 5500,1688.9 5563.98,1624.92 5580.31,1608.58 J?_2.4
Net*1_9: *1.9 R9_2.2 U3_2.7 | length 230.8
  Top Layer w10: *1.9 5600,1865.97 R9_2.2 5650.31,1815.66 U3_2.7
Net*1_10: *1.10 R7_2.2 U3_2.6 | length 231.9
  Top Layer w10: U3_2.6@5669.5,1790.5 R7_2.2@5669.5,1836.47 ; R7_2.2 5658.27,1862.05 5658.27,1958.27 *1.10
Net*1_11: *1.11 R8_2.2 U3_2.5 | length 256.6
  Top Layer w10: U3_2.5 5689.69,1812.3 5709.91,1832.52 5712.2,1832.52 5718.06,1838.38 R8_2.2@5718.06,1840.68 ; R8_2.2 5800,1920.31 *1.11
Net*1_12: *1.12 Q1.2 R1.2 | length 570.3
  Top Layer w10: *1.12 6009.37,1890.63 R1.2 6389.83,1870.8 6416.53,1870.8 Q1.2
Net*1_13: *1.13 J?_1.4 | length 713
  Top Layer w10: J?_1.4 5619.69,3054.14 5625.54,3060 5760,3060 v1(5830,2990) ; *1.13 5900,2836.31 5910,2846.31 v1(5910,2850)
  Bottom Layer w10: v1(5830,2990) 5910,2910 v1(5910,2850)
Net*1_14: *1.14 J?_1.5 | length 563.8
  Top Layer w10: *1.14 5800,2750 v1(5850,2800)
  Bottom Layer w10: v1(5660,3000) 5770,3000 5850,2920 v1(5850,2800)
Net*1_15: *1.15 R9_1.2 U3_1.7 | length 329.1
  Top Layer w10: U3_1.7 5574.84,2814.84 5597.8,2791.89 5608.55,2791.89 5613.47,2786.97 v1(5617.16,2786.97) ; *1.15 5700,2608.85 5730,2638.85 v1(5730,2680)
  Bottom Layer w10: v1(5617.16,2786.97) 5620.1,2786.97 5727.06,2680 v1(5730,2680)
Net*1_21: *1.21 P4.6 | length 1567.5
  Top Layer w10: v1(5080,2920) 5356.5,2920 5590.39,3153.9 6146.1,3153.9 P4.6
  Bottom Layer w10: v1(5080,2920) 5080,2700 5100,2680 *1.21
Net*1_22: *1.22 P5.6 | length 859.8
  Top Layer w10: P5.6 4404.18,2104.18 v1(4444.13,2104.18) ; v1(4600,2110) 5000,2510 *1.22
  Bottom Layer w10: v1(4444.13,2104.18) 4590.49,2104.18 4596.31,2110 v1(4600,2110)
Net*1_23: *1.23 P3.6 | length 624.3
  Top Layer w10: P3.6 4600,2900 *1.23
NetC6_1: C6.1 L1.1 U1.5 | length 262
  Top Layer w10: C6.1 5981.54,2348.46 6028.46,2348.46 U1.5 6044.05,2350 6063.34,2330.71 6063.34,2215.03 6028.82,2180.52 L1.1@6023.9,2180.52
NetC6_2: C6.2 U1.6 | length 50.2
  Top Layer w10: C6.2 5980.24,2312.83 6029.76,2312.83 U1.6
NetD1_2: D1.2 Q2.4 R5.2 | length 179.5
  Top Layer w10: Q2.4 Q2.4 6199.95,2450.36 6260.31,2390 D1.2
NetD2_2: D2.2 J1.2 Q2.5-6-7-8 | length 261.4
  Top Layer w10: 6090.81,2558.68 6090.81,2590.45 D2.2 6191.26,2621.26 J1.2
NetDS1_1: DS1.1 R6.1 | length 48.7
  Top Layer w10: R6.1 6205.43,1960 6240,1960 ; DS1.1@6255.43,1958.46 DS1.1
NetLED1_1: LED1.1 LED2.4 | length 214.6
  Top Layer w10: LED2.4 6553.27,2175.2 6586.73,2141.73 LED1.1
NetLED1_4: LED1.4 Q1.3 R2.2 | length 143.3
  Top Layer w10: Q1.3 6540.31,1910 R2.2 6556.63,1933.05 6556.63,2002.03 LED1.4
NetLED2_1: LED2.1 LED3.4 | length 224.6
  Top Layer w10: LED3.4 6553.27,2430.2 6586.73,2396.73 LED2.1
OUT1_1: J?_1.1 U3_1.2 | length 165.6
  Top Layer w10: v1(5500,2970) 5500.79,2970.79 5500.79,3009.33 J?_1.1 ; U3_1.2 5574.84,2948.97 5579.67,2953.8 v1(5579.67,2957.48)
  Bottom Layer w10: v1(5500,2970) 5547.86,2970 5557.77,2960.09 5577.07,2960.09 v1(5579.67,2957.48)
OUT1_2: J?_2.1 U3_2.2 | length 177.6
  Top Layer w10: v1(5646.95,1658.06) 5650.31,1661.42 U3_2.2 ; J?_2.1 5699.84,1591.3 5699.84,1655.97 v1(5701.25,1657.38)
  Bottom Layer w10: v1(5646.95,1658.06) 5700.58,1658.06 v1(5701.25,1657.38)
OUT2_1: J?_1.2 U3_1.3 | length 77.8
  Top Layer w10: J?_1.2@5540.94,2991.42 5540.94,2959.06 5555.16,2944.84 U3_1.3
OUT2_2: J?_2.2 U3_2.3 | length 128.6
  Top Layer w10: J?_2.2 5659.06,1608.58 5673.6,1623.13 5673.6,1669.1 5670,1672.7 U3_2.3
P3V3: C9.1 C10.1 C11.1 C12_1.2 C12_2.2 DS1.2 P1.2 P2.2 P3.2 P4.2 P5.2 Q1.1 R1.1 R3.2 R4.2 U2.5 U3_1.8 U3_2.8 | length 7442.4
  Top Layer w10: P5.2 4352.48,2452.48 4352.48,1791.87 4564.35,1580 v1(4660,1580) ; v1(4950,1550) P1.2 5346.02,1846.02 5346.02,2011.11 5484.91,2150 5540,2150 ; P3.2 5007.39,3092.61 5007.39,3012.61 v1(5010,3010) ; v1(5220,2760) 5220,2701.61 R4.2 ; v1(5470,2740) 5470,2708.39 R3.2 5478.39,2701.77 5486.61,2710 5610,2710 5620,2720 ; v1(5550,2580) 5550,2576.31 5540,2566.31 5540,2150 ; C12_2.2 5550,1867.72 5550,2140 ; C12_2.2@5592.23,1825.49 5603.64,1825.49 U3_2.8@5630.63,1798.5 ; U3_1.8 5594.78,2840.25 5632.03,2840.25 C12_1.2 5632.28,2809.53 5643.81,2798.01 5643.81,2743.81 5620,2720 ; v1(5640,2700) 5620,2720 ; U2.5 6354.68,2112.74 6354.68,2054.68 C10.1@6351.54,2051.54 ; R1.1 6397.32,1930 6403.98,1936.65 6403.98,1938.62 6414.72,1949.37 Q1.1 ; C9.1@6390,2052.99 6397.5,2045.49 6398.66,2045.49 6416.69,2027.45 Q1.1 ; v1(6450,2160) 6390,2100 C9.1 6388.46,2051.54 C10.1@6351.54,2051.54 ; v1(6460,2260) 6460,2960 P4.2 ; P2.2 6600,1733.43 6429.41,1904.02 6429.41,1938.62 6418.66,1949.37 Q1.1 ; 5540,2150 5550,2140 ; 5550,2140 5610,2080 6196.97,2080 DS1.2 6261.02,2016.97 6286.47,2042.42 6302.5,2042.42 6310,2049.92 C11.1 C10.1 C10.1@6351.54,2051.54
  Bottom Layer w10: v1(4660,1580) 4920,1580 v1(4950,1550) ; v1(5010,3010) 5160,3010 5220,2950 v1(5220,2760) 5341.27,2760 5358.01,2776.74 5442.63,2776.74 5467.39,2751.98 5467.39,2742.61 v1(5470,2740) ; v1(5550,2580) 5550,2615.09 5632.31,2697.39 5637.39,2697.39 v1(5640,2700) ; v1(6450,2160) 6450,2246.31 6460,2256.31 v1(6460,2260)
P5V0: *1.Vin C1.1 C2.1 C3.1 C7.1 C8.1 L1.2 LED1.2 LED2.2 LED3.2 R2.1 U1.1 U2.1 U2.3 | length 3596.4
  Top Layer w10: v1(4600,2390) *1.Vin ; v1(6100,2250) 6121.77,2271.77 U1.1 6135.82,2312.6 6158.42,2290 C8.1 ; L1.2 6226.61,2210 U2.3 ; C8.1@6256.23,2290 6263.73,2282.5 6263.73,2277.48 6282.6,2258.6 U2.3 ; C7.1 6377.56,2251.64 6357.4,2231.48 U2.1 ; v1(6520,2210) U2.1 ; R2.1 6623.07,1953.39 C1.1 ; v1(6580,2210) 6623.07,2210 ; LED2.2@6580,2248.66 6589.04,2257.7 6620.77,2257.7 C2.1 ; LED1.2 6589.04,2007.7 6620.77,2007.7 C1.1 ; LED3.2 6589.04,2517.7 6617.7,2517.7 C3.1 6621.54,2518.46 6621.54,2261.54 C2.1 ; U2.3 6282.6,2188.52 6303.66,2167.46 6336.34,2167.46 6357.4,2188.52 U2.1 ; C1.1 6623.07,2210 ; 6623.07,2210 C2.1
  Bottom Layer w10: v1(4600,2390) 4600,2270 4620,2250 5281.5,2250 5368.16,2163.35 6013.35,2163.35 v1(6100,2250) ; v1(6520,2210) v1(6580,2210)
SCL: *1.19 P1.5 P2.5 P3.5 P4.5 P5.5 R4.1 | length 5904.6
  Top Layer w10: P5.5 4470,2200 ; v1(4490,2200) 4470,2200 ; P3.5 5010,2790 v1(5300,2790) 5300,2701.61 R4.1 5300,2698.39 *1.19 5300,2220 v1(5280,2200) ; v1(4740,1440) 4705.86,1440 4700,1445.86 P1.5 4700,1670 4480,1890 4480,2190 4470,2200 ; v1(4830,1450) 4832.61,1447.39 4841.38,1447.39 4842.67,1446.1 5026.2,1446.1 5028.96,1443.35 5051.04,1443.35 5053.8,1446.1 6290.24,1446.1 6300,1455.86 P2.5 ; v1(5670.47,2786.38) 5726.38,2786.38 5957.87,3017.87 6282.02,3017.87 6300,3035.86 P4.5
  Bottom Layer w10: v1(4490,2200) v1(5280,2200) ; v1(4740,1440) 4816.31,1440 4826.31,1450 v1(4830,1450) ; v1(5300,2790) 5323.62,2813.62 5628.2,2813.62 5652.83,2788.98 5667.86,2788.98 v1(5670.47,2786.38)
SDA: *1.18 P1.4 P2.4 P3.4 P4.4 P5.4 R3.1 | length 6058.1
  Top Layer w10: P5.4 4530,2300 ; v1(4650,2300) 4530,2300 ; P3.4 5040,2860 5320,2860 5401.57,2778.43 R3.1 R3.1 ; v1(5343.35,2310) 5347.03,2310 5358.3,2321.26 5362.93,2321.26 5370,2328.33 5370,2566.36 5400,2596.36 5400,2698.39 R3.1 ; P2.4 6396.6,1496.6 6396.6,1428.16 6390.75,1422.31 4805.86,1422.31 4800,1428.16 P1.4 4800,1650 4530,1920 4530,2300 ; P4.4 6389.86,3089.86 6389.86,3049.86 6340,3000 6000,3000 5662.13,2662.13 5490.98,2662.13 5490.59,2662.52 5448.11,2662.52 5445.18,2665.45 5434.2,2665.45 5401.61,2698.03 R3.1
  Bottom Layer w10: v1(4650,2300) 5311.54,2300 5318.93,2307.39 5340.74,2307.39 v1(5343.35,2310)
VIN: C4.1 C5.1 C13_1.2 C13_2.2 C14_1.2 C14_2.2 D1.1 J?_1.3 J?_2.3 Q2.1 Q2.2 Q2.3 U1.2 U1.3 U3_1.1 U3_2.1 | length 2397.3
  Top Layer w10: C14_2.2 5575.54,1711 v1(5610,1711) U3_2.1 ; J?_1.3 5580.31,2991.42 5587.13,2984.61 5590.24,2984.61 5598.94,2975.91 5614.13,2960.71 5614.13,2919.5 ; C14_2.2@5592.56,1697.91 5592.56,1686.14 C13_2.2@5607.72,1670.98 ; U3_1.1 5614.13,2919.5 ; C13_2.2 5607.72,1620.55 5619.69,1608.58 J?_2.3 ; C13_1.2 5635.35,2946.93 5635.35,2924.17 ; 5635.35,2919.5 5614.13,2919.5 ; C14_1.2 5650.67,2890 v1(5668.03,2872.64) ; v1(5910,2120) 5910,2122.67 5900,2132.67 5900,2460 5924.57,2484.57 5961.29,2484.57 ; v1(5950,2510) 5950,2495.86 5961.29,2484.57 ; C4.1 6033.13,2445.57 6071.2,2445.57 6073.09,2447.46 Q2.1 Q2.2 Q2.3 6123.02,2449.16 6123.02,2388.65 U1.3 ; C4.1@6036.38,2429.06 6026.5,2438.94 6026.5,2474.61 6016.54,2484.57 5961.29,2484.57 ; U1.2 U1.3 ; D1.1 6173.03,2387.4 U1.3
  Bottom Layer w10: v1(5610,1711) 5746.27,1847.27 5897.27,1847.27 5946.02,1896.02 5946.02,2083.98 v1(5910,2120) ; v1(5668.03,2872.64) 5796.12,2744.55 5895.45,2744.55 5950,2690 v1(5950,2510)
VINUP: J1.1
pads on no net: *1.1 *1.2 *1.3 *1.3V3 *1.16 *1.17 *1.20 LED3.1 P1.1 P1.7 P2.1 P2.7 P3.1 P3.7 P4.1 P4.7 P5.1 P5.7 U2.4

## Polygon pours and split planes (outlines as drawn)
GND on Bottom Layer "GND_L02_P000" (solid, pour order 0): 4140,3300 7440,3300 7440,1160 4070,1160 4070,3230

## Silkscreen, mask and mechanical layers (free items; w line width, h text height)
Mechanical 1:
  the board outline again, w10